# Altium PCB MainBoardPCB_PWR.PcbDoc (part 9 of 29)
Units mm, origin at the board's own origin, x right, y up, seen from the top; angles counter-clockwise.
Board outline 333.63 x 349.38 mm, 16 copper layers (L1, L2 (GND), L3 (Sign), L4 (GND), L5 (Sign), L6 (PWR/GND), L7(PWR/GND), L8 (PWR/GND), L9 (PWR/GND), L10 (PWR/GND), L11 (PWR/GND), L12 (Sign), L13 (GND), L14 (Sign), L15 (GND), L16), stack 2.503 mm thick; 2187 components, 1615 nets, 7987 pads, 1695 vias.
Unrouted connection lines stored in the file: 4757.
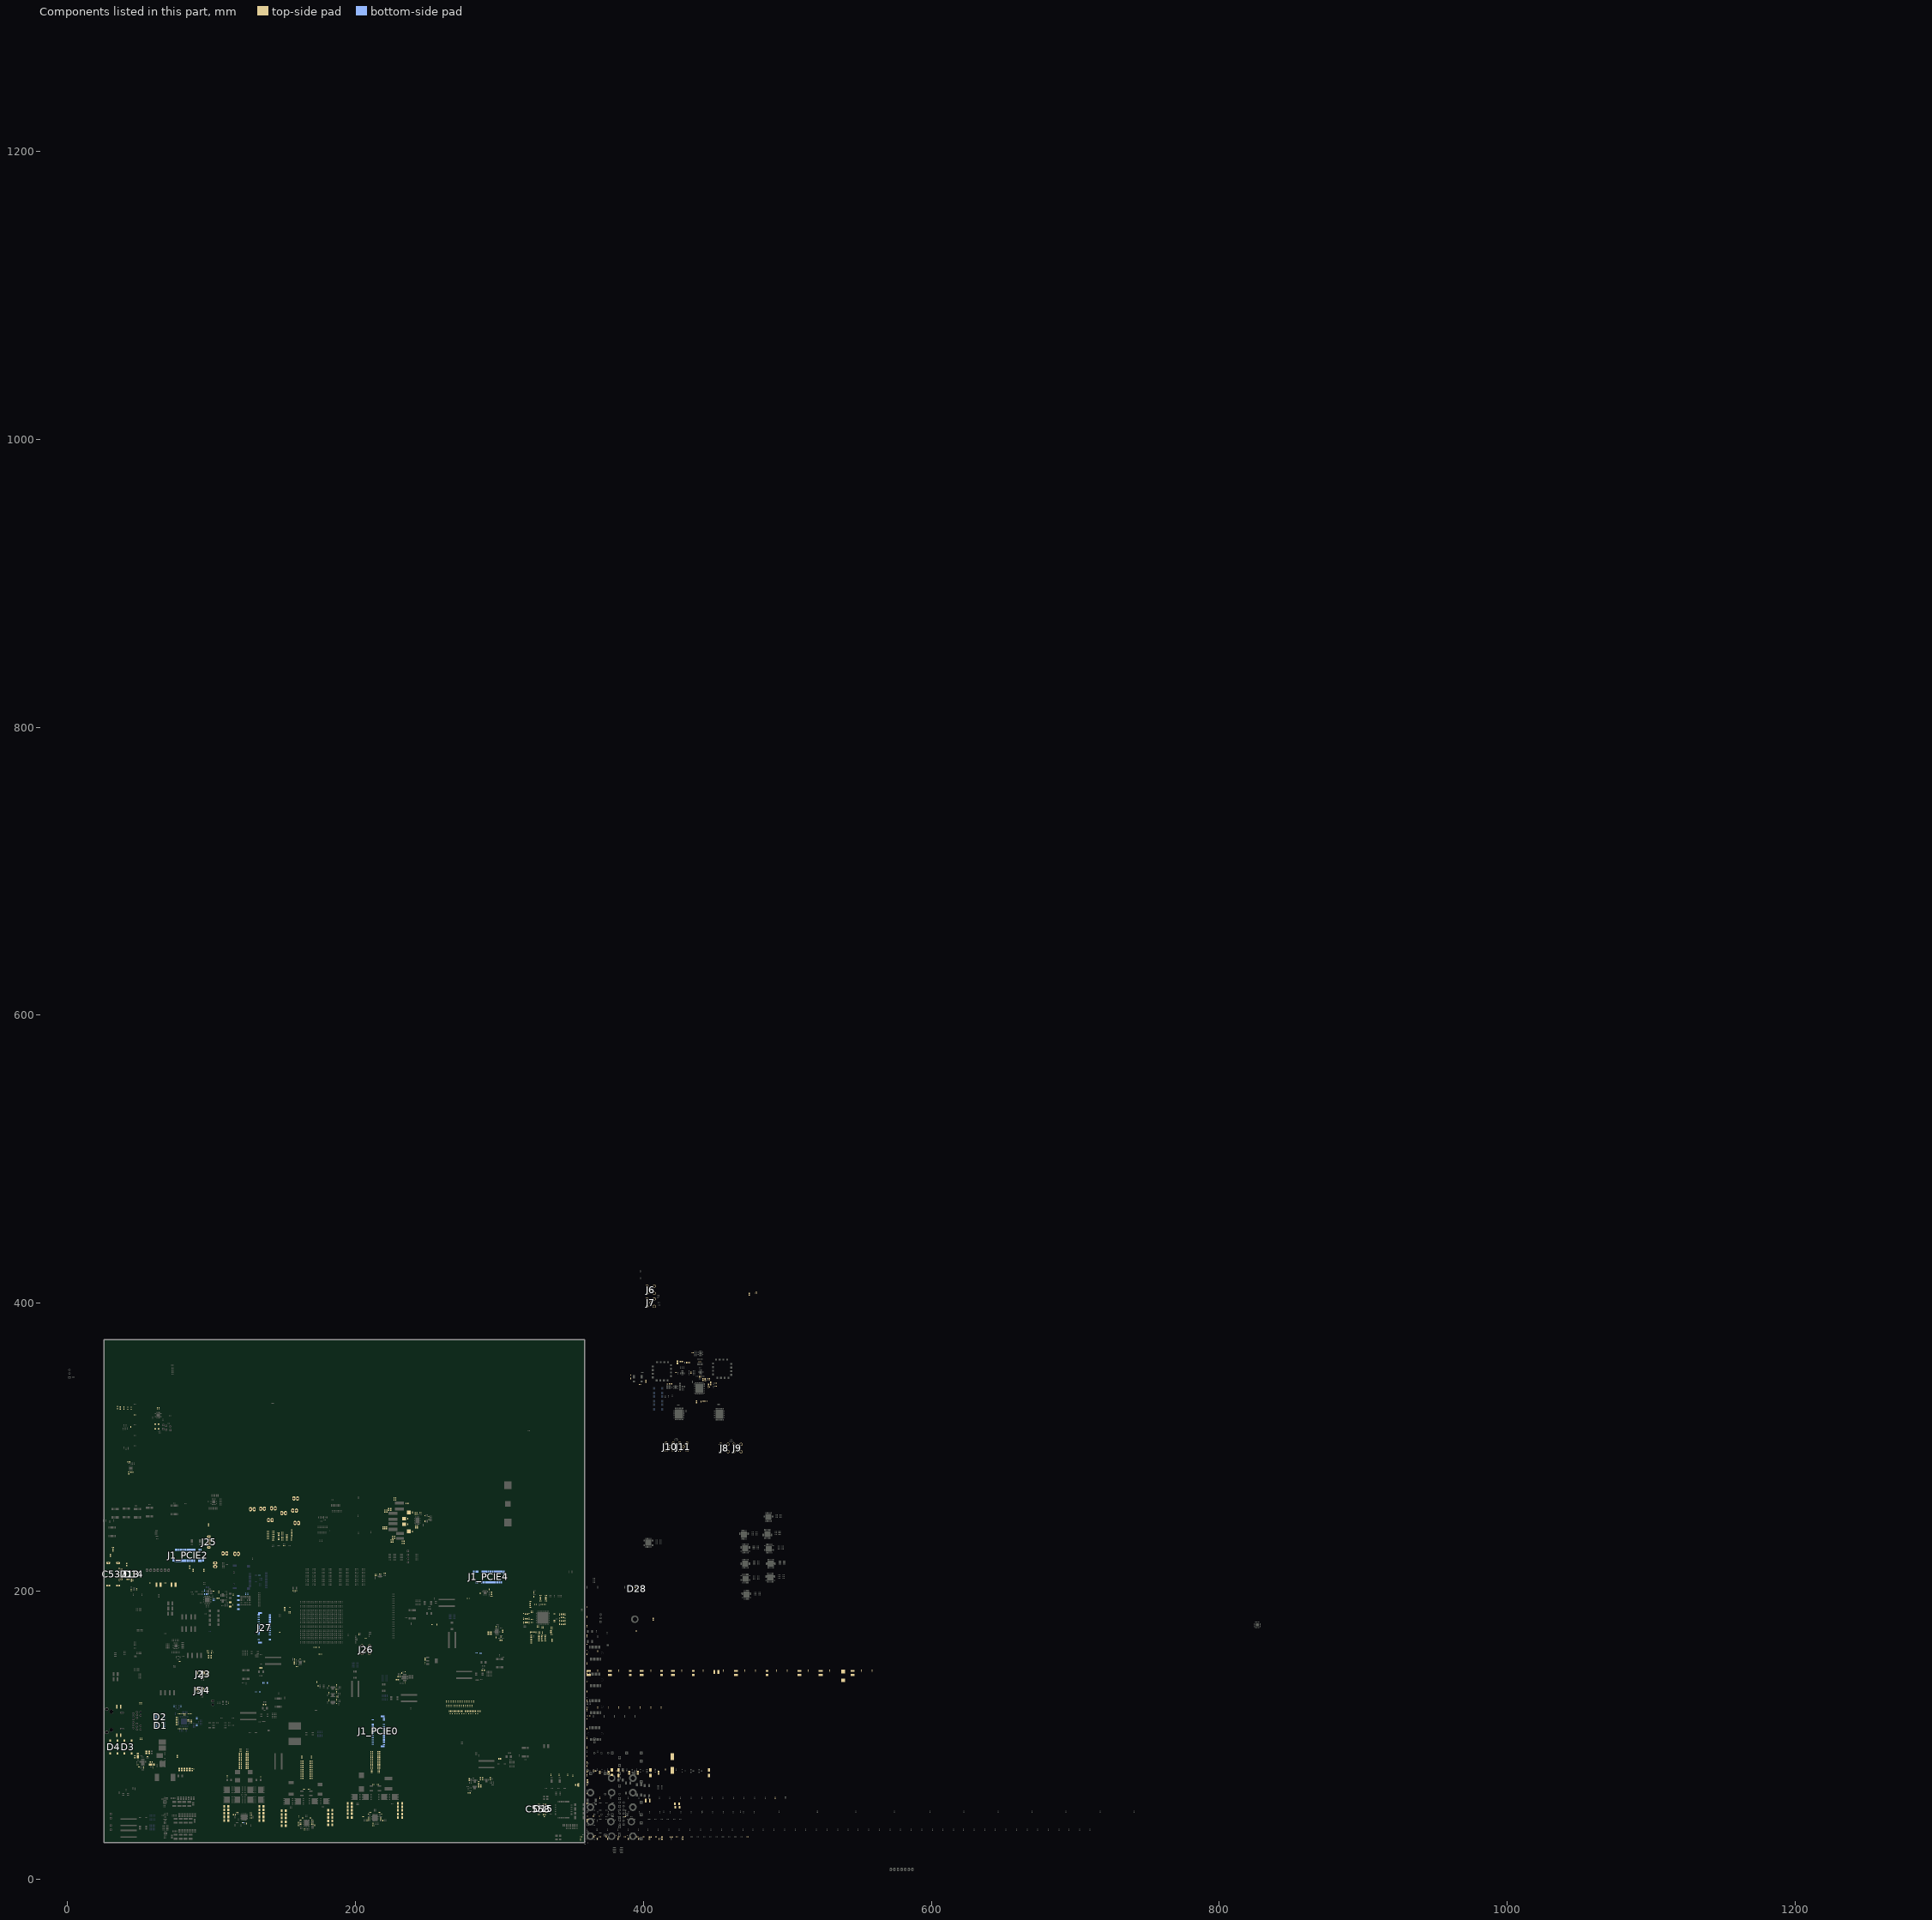
[diagram p14: the components of this part, seen from the top]

## Part data (continued)
C358: library part Capacitor, "Cap Ceramic 1uF 10V X5R 10% SMD 0603 85C Paper T/R", Case Code (Imperial)=0603, Case Code (Metric)=1608, Dielectric=X5R, Manufacturer=Samsung, Manufacturer Part Number=CL10A105KP8NNNC, Max Operating Temperature=85°C, Min Operating Temperature=-55°C, Package Quantity=1, Supplier Part Number 1=1276-1182-1-ND, Tolerance=10%, Voltage=10V, Capacitance=1uF, Case/Package=0603, Category="Ceramic Capacitors", ComponentLink1Description=https://datasheet.ciiva.com/15195/getdatasheetpartid-358616-15195708.pdf?src-supplier=Verical, ComponentLink1URL=https://datasheet.ciiva.com/15195/getdatasheetpartid-358616-15195708.pdf?src-supplier=Verical, ComponentLink2Description=https://datasheet.ciiva.com/16358/cl05b104kq5nnnc-16358431.pdf?src-supplier=Future+Electronics, ComponentLink2URL=https://datasheet.ciiva.com/16358/cl05b104kq5nnnc-16358431.pdf?src-supplier=Future+Electronics, Contact Plating=Tin, Depth=0.8mm, Height=0.8mm, Length=1.6mm, Mount="Surface Mount", Packaging="Tape and Reel", Pricing 1="1=0,10000, 10=0,03600, 100=0,01610, 500=0,01152, 1000=0,00905 (USD)", Radiation Hardening=No, RoHS=Yes, Stock 1=3646234, Supplier 1=Digi-Key, Thickness=0.035inch, Voltage Rating=10V, Width=0.031inch
C360 C378: library part Capacitor, Case Code (Imperial)=0402, Case Code (Metric)=1005, Dielectric=X5R, Manufacturer=Samsung, Manufacturer Part Number=CL05A474KP5NNNC, Max Operating Temperature=85°C, Min Operating Temperature=-55°C, Supplier Part Number 1=1276-1173-1-ND, Tolerance=10%, Voltage Rating=10V, Capacitance=470nF, Case/Package=0402, ComponentLink1Description=https://datasheet.ciiva.com/25710/cl05a474kp5nnnc-25710324.pdf?src-supplier=Digi-Key, ComponentLink1URL=https://datasheet.ciiva.com/25710/cl05a474kp5nnnc-25710324.pdf?src-supplier=Digi-Key, ComponentLink2Description=https://datasheet.ciiva.com/26838/getdatasheetpartid-355286-26838191.pdf?src-supplier=Verical, ComponentLink2URL=https://datasheet.ciiva.com/26838/getdatasheetpartid-355286-26838191.pdf?src-supplier=Verical, ComponentLink3Description=https://datasheet.ciiva.com/16437/cl05b104kq5nnnc-16437351.pdf?src-supplier=Future+Electronics, ComponentLink3URL=https://datasheet.ciiva.com/16437/cl05b104kq5nnnc-16437351.pdf?src-supplier=Future+Electronics, Depth=0.5mm, Height=0.5mm, Lead Free="Lead Free", Length=1mm, Mount="Surface Mount", Packaging="Tape and Reel", Pricing 1="1 = 0,10000, 10 = 0,07000, 100 = 0,03140, 500 = 0,02240, 1000 = 0,01761, 2500 = 0,01600, 5000 = 0,01472 (USD)", Radiation Hardening=No, RoHS=Yes, Stock 1=941442, Supplier 1=Digi-Key, Thickness=0.022inch, Voltage Rating (DC)=10V, Width=0.02inch
C362 C380 C539 C560 C563_5V_to_3V3_for_FTDI C563_U_5V_to_3V31 C563_U_5V_to_3V32 C563_U_5V_to_3V33 C564_5V_to_3V3_for_FTDI C564_U_5V_to_3V31 C564_U_5V_to_3V32 C564_U_5V_to_3V33 C565_5V_to_3V3_for_FTDI C565_U_5V_to_3V31 C565_U_5V_to_3V32 C565_U_5V_to_3V33 C659 C661: library part Capacitor, Case Code (Imperial)=0603, Case Code (Metric)=1608, Dielectric=X5R, Manufacturer=Samsung, Manufacturer Part Number=CL10A475KP8NNNC, Max Operating Temperature=85°C, Min Operating Temperature=-55°C, Package Quantity=1, Supplier Part Number 1=1276-1044-1-ND, Tolerance=10%, Voltage Rating=10V, Capacitance=4.7uF, Case/Package=0603, ComponentLink1Description=https://datasheet.ciiva.com/25797/cl10a475kp8nnnc-25797520.pdf?src-supplier=Digi-Key, ComponentLink1URL=https://datasheet.ciiva.com/25797/cl10a475kp8nnnc-25797520.pdf?src-supplier=Digi-Key, ComponentLink2Description=https://datasheet.ciiva.com/26838/getdatasheetpartid-358676-26838384.pdf?src-supplier=Verical, ComponentLink2URL=https://datasheet.ciiva.com/26838/getdatasheetpartid-358676-26838384.pdf?src-supplier=Verical, ComponentLink3Description=https://datasheet.ciiva.com/16318/cl05b104kq5nnnc-16318245.pdf?src-supplier=Future+Electronics, ComponentLink3URL=https://datasheet.ciiva.com/16318/cl05b104kq5nnnc-16318245.pdf?src-supplier=Future+Electronics, Contact Plating=Tin, Depth=0.8mm, Height=0.8mm, Length=1.6mm, Mount="Surface Mount", Packaging="Tape and Reel", Pricing 1="1 = 0,13000, 10 = 0,09600, 100 = 0,04520, 500 = 0,03168, 1000 = 0,02622 (USD)", Radiation Hardening=No, RoHS=Yes, Stock 1=2124648, Supplier 1=Digi-Key, Thickness=0.035inch, Width=0.031inch
C363 C365 C367 C369 C381 C383 C385 C387 C572 C576 C598 C631: library part Capacitor, Case Code (Imperial)=0603, Case Code (Metric)=1608, Dielectric=X5R, Manufacturer=Murata, Manufacturer Part Number=GRM188R61A106KE69D, Max Operating Temperature=85°C, Min Operating Temperature=-55°C, Supplier Part Number 1=490-10474-1-ND, Tolerance=10%, Voltage=10V, Capacitance=10uF, Case/Package=0603, ComponentLink1Description=http://components.arrow.com/part/dataview/0323_07281717?src-supplier=Arrow+Europe, ComponentLink1URL=http://components.arrow.com/part/dataview/0323_07281717?src-supplier=Arrow+Europe, ComponentLink2Description=http://www.farnell.com/datasheets/1955682.pdf?src-supplier=Farnell, ComponentLink2URL=http://www.farnell.com/datasheets/1955682.pdf?src-supplier=Farnell, ComponentLink3Description=http://www.mouser.com/ds/2/281/c02e-2905.pdf?src-supplier=Mouser, ComponentLink3URL=http://www.mouser.com/ds/2/281/c02e-2905.pdf?src-supplier=Mouser, ComponentLink4Description=http://search.murata.co.jp/Ceramy/image/img/A01X/G101/ENG/GRM188R61A106KE69-01.pdf?src-supplier=Digi-Key, ComponentLink4URL=http://search.murata.co.jp/Ceramy/image/img/A01X/G101/ENG/GRM188R61A106KE69-01.pdf?src-supplier=Digi-Key, ComponentLink5Description=http://www.farnell.com/datasheets/1955682.pdf?src-supplier=Element14, ComponentLink5URL=http://www.farnell.com/datasheets/1955682.pdf?src-supplier=Element14, ComponentLink6Description=http://www.farnell.com/datasheets/1955682.pdf?src-supplier=Newark, ComponentLink6URL=http://www.farnell.com/datasheets/1955682.pdf?src-supplier=Newark, ComponentLink7Description=http://psearch.en.murata.com/capacitor/product/GRM188R61A106KE69%23.pdf?src-supplier=Avnet, ComponentLink7URL=http://psearch.en.murata.com/capacitor/product/GRM188R61A106KE69%23.pdf?src-supplier=Avnet, Depth=0.8mm, Height=0.8mm, Lead Free="Lead Free", Length=1.6mm, Mount="Surface Mount", Packaging="Tape and Reel", Pricing 1="1 = 0,21000, 10 = 0,14000, 100 = 0,07110, 500 = 0,04864, 1000 = 0,04303 (USD)", REACH SVHC="No SVHC", RoHS=Yes, Stock 1=4597169, Supplier 1=Digi-Key, Thickness=0.037inch, Voltage Rating=10V, Voltage Rating (DC)=10V, Width=0.031inch
C364 C366 C368 C370 C382 C384 C386 C388: library part Capacitor, Case Code (Imperial)=0603, Case Code (Metric)=1608, Dielectric=X5R, Manufacturer=Murata, Manufacturer Part Number=GRM188R61A226ME15D, Max Operating Temperature=85°C, Min Operating Temperature=-55°C, Package Quantity=4000, Supplier Part Number 1=490-10476-1-ND, Tolerance=20%, Voltage Rating=10V, Capacitance=22uF, Case/Package=0603, ComponentLink1Description=https://datasheet.ciiva.com/46444/1769893-46444975.pdf?src-supplier=Element14, ComponentLink1URL=https://datasheet.ciiva.com/46444/1769893-46444975.pdf?src-supplier=Element14, Depth=0.8mm, Height=0.8mm, Lead Free="Lead Free", Length=1.6mm, Material=Ceramic, Mount="Surface Mount", Packaging="Tape and Reel", Pricing 1="1 = 0,31000, 10 = 0,21500, 100 = 0,12160, 500 = 0,08584, 1000 = 0,07512 (USD)", REACH SVHC="No SVHC", RoHS=Yes, Stock 1=1768748, Supplier 1=Digi-Key, Termination=SMD/SMT, Thickness=0.039inch, Voltage Rating (DC)=10V, Weight=0.000222oz, Width=0.8mm
C371 C372 C373 C374 C375 C376: library part Capacitor, "Cap Ceramic 10uF 25V X5R 10% SMD 1206 85C Embossed T/R", Case Code (Imperial)=1206, Case Code (Metric)=3216, Dielectric=X5R, Manufacturer=Samsung, Manufacturer Part Number=CL31A106KAHNNNE, Max Operating Temperature=85°C, Min Operating Temperature=-55°C, Supplier Part Number 1=1276-1075-1-ND, Tolerance=10%, Voltage=25V, Capacitance=10uF, Case/Package=1206, Category="Ceramic Capacitors", ComponentLink1Description=https://datasheet.ciiva.com/25710/cl31a106kahnnne-25710837.pdf?src-supplier=Digi-Key, ComponentLink1URL=https://datasheet.ciiva.com/25710/cl31a106kahnnne-25710837.pdf?src-supplier=Digi-Key, ComponentLink2Description=https://datasheet.ciiva.com/15195/getdatasheetpartid-355210-15195990.pdf?src-supplier=Verical, ComponentLink2URL=https://datasheet.ciiva.com/15195/getdatasheetpartid-355210-15195990.pdf?src-supplier=Verical, ComponentLink3Description=https://datasheet.ciiva.com/29201/452519-da-01-en-vs-kondensator-1206-29201124.pdf?src-supplier=Conrad, ComponentLink3URL=https://datasheet.ciiva.com/29201/452519-da-01-en-vs-kondensator-1206-29201124.pdf?src-supplier=Conrad, Contact Plating=Tin, Depth=1.6mm, Height=1.6mm, Lead Free="Lead Free", Length=3.2mm, Material=Ceramic, Mount="Surface Mount", Packaging="Tape and Reel", Pricing 1="1=0,22000, 10=0,15000, 100=0,07600, 500=0,05200, 1000=0,04600 (USD)", Radiation Hardening=No, RoHS=Yes, Stock 1=791813, Supplier 1=Digi-Key, Thickness=0.071inch, Voltage Rating=25V, Voltage Rating (DC)=25V, Width=0.063inch
C389 C393 C430 C434: library part Capacitor, Case/Package=0402, Case Code (Metric)=1005, Dielectric=C0G, Manufacturer="Kyocera AVX", Manufacturer Part Number=04025A220JAT2A, Max Operating Temperature=125°C, Min Operating Temperature=-55°C, Package Quantity=1, Supplier Part Number 1=478-1074-1-ND, Temperature Coefficient=30ppm/°C, Tolerance=5%, Voltage=50V, Capacitance=22pF, Case Code (Imperial)=0402, ComponentLink1Description=https://datasheet.ciiva.com/11787/0900766b80def0e2-11787300.pdf?src-supplier=RSComponents, ComponentLink1URL=https://datasheet.ciiva.com/11787/0900766b80def0e2-11787300.pdf?src-supplier=RSComponents, ComponentLink2Description=https://datasheet.ciiva.com/39121/2009578-39121644.pdf?src-supplier=Jameco, ComponentLink2URL=https://datasheet.ciiva.com/39121/2009578-39121644.pdf?src-supplier=Jameco, ComponentLink3Description=https://datasheet.ciiva.com/1123/ccog-1123585.pdf?src-supplier=Element14, ComponentLink3URL=https://datasheet.ciiva.com/1123/ccog-1123585.pdf?src-supplier=Element14, ComponentLink4Description=https://datasheet.ciiva.com/1123/ccog-1123586.pdf?src-supplier=Element14, ComponentLink4URL=https://datasheet.ciiva.com/1123/ccog-1123586.pdf?src-supplier=Element14, ComponentLink5Description=https://datasheet.ciiva.com/150/ccog-150515.pdf?src-supplier=Digi-Key, ComponentLink5URL=https://datasheet.ciiva.com/150/ccog-150515.pdf?src-supplier=Digi-Key, ComponentLink6Description=https://datasheet.ciiva.com/150/ccog-150516.pdf?src-supplier=Digi-Key, ComponentLink6URL=https://datasheet.ciiva.com/150/ccog-150516.pdf?src-supplier=Digi-Key, ComponentLink7Description=https://datasheet.ciiva.com/150/ccog-150517.pdf?src-supplier=Digi-Key, ComponentLink7URL=https://datasheet.ciiva.com/150/ccog-150517.pdf?src-supplier=Digi-Key, ComponentLink8Description=https://datasheet.ciiva.com/2987/ccog-2987653.pdf?src-supplier=Avnet, ComponentLink8URL=https://datasheet.ciiva.com/2987/ccog-2987653.pdf?src-supplier=Avnet, ComponentLink9Description=https://datasheet.ciiva.com/2987/ccog-2987654.pdf?src-supplier=Avnet, ComponentLink9URL=https://datasheet.ciiva.com/2987/ccog-2987654.pdf?src-supplier=Avnet, ComponentLink10Description=https://datasheet.ciiva.com/5423/ccog-243403-5423927.pdf?src-supplier=Mouser, ComponentLink10URL=https://datasheet.ciiva.com/5423/ccog-243403-5423927.pdf?src-supplier=Mouser, ComponentLink11Description=https://datasheet.ciiva.com/16218/ccog-16218185.pdf?src-supplier=Future+Electronics, ComponentLink11URL=https://datasheet.ciiva.com/16218/ccog-16218185.pdf?src-supplier=Future+Electronics, ComponentLink12Description=https://datasheet.ciiva.com/28592/759117-28592746.pdf?src-supplier=Element14, ComponentLink12URL=https://datasheet.ciiva.com/28592/759117-28592746.pdf?src-supplier=Element14, ComponentLink13Description=https://datasheet.ciiva.com/15165/getdatasheetpartid-38041-15165131.pdf?src-supplier=Verical, ComponentLink13URL=https://datasheet.ciiva.com/15165/getdatasheetpartid-38041-15165131.pdf?src-supplier=Verical, Contact Plating=Tin,Matte, Depth=0.5mm, Height=0.5mm, Lead Free="Lead Free", Length=1mm, Mount="Surface Mount", Number of Pins=2, Packaging="Tape and Reel", Pricing 1="1 = 0,10000, 10 = 0,03500, 100 = 0,01550, 500 = 0,01108, 1000 = 0,00871, 2500 = 0,00792, 5000 = 0,00729 (USD)", Radiation Hardening=No, REACH SVHC="No SVHC", RoHS=Yes, Stock 1=1489814, Supplier 1=Digi-Key, Termination=SMD/SMT, Thickness=0.022inch, Voltage Rating=50V, Voltage Rating (DC)=50V, Width=0.02inch
C390 C394 C431 C435: library part Capacitor, Case/Package=0402, Case Code (Metric)=1005, Dielectric=X5R, Manufacturer=Multicomp, Manufacturer Part Number=MC0402X104K160CT, Max Operating Temperature=85°C, Min Operating Temperature=-55°C, Supplier Part Number 1=2310529, Tolerance=10%, Voltage Rating=16V, Capacitance=100nF, Case Code (Imperial)=0402, ComponentLink1Description=https://datasheet.ciiva.com/22648/1901289-22648380.pdf?src-supplier=Element14, ComponentLink1URL=https://datasheet.ciiva.com/22648/1901289-22648380.pdf?src-supplier=Element14, ComponentLink2Description=https://datasheet.ciiva.com/22648/1901289-22648381.pdf?src-supplier=Element14, ComponentLink2URL=https://datasheet.ciiva.com/22648/1901289-22648381.pdf?src-supplier=Element14, ComponentLink3Description=https://datasheet.ciiva.com/22686/1901289-22686271.pdf?src-supplier=Element14, ComponentLink3URL=https://datasheet.ciiva.com/22686/1901289-22686271.pdf?src-supplier=Element14, Number of Pins=2, Packaging="Cut Tape", REACH SVHC=Unknown, RoHS=Yes, Stock 1=510000, Supplier 1=Farnell, Voltage Rating (DC)=16V
C395 C398 C408 C420 C436 C439 C449 C461 C522: library part Capacitor, Case/Package=0402, Case Code (Metric)=1005, Dielectric=X5R, Manufacturer=Yageo, Manufacturer Part Number=CC0402KRX5R6BB105, Max Operating Temperature=85°C, Min Operating Temperature=-55°C, Package Quantity=1, Supplier Part Number 1=311-1439-1-ND, Tolerance=10%, Voltage Rating=10V, Capacitance=1uF, Case Code (Imperial)=0402, ComponentLink1Description=https://datasheet.ciiva.com/176/upy-gphc-x5r-4v-to-50v-12-176704.pdf?src-supplier=Digi-Key, ComponentLink1URL=https://datasheet.ciiva.com/176/upy-gphc-x5r-4v-to-50v-12-176704.pdf?src-supplier=Digi-Key, ComponentLink2Description=https://datasheet.ciiva.com/176/mlccorderingcode-176705.pdf?src-supplier=Digi-Key, ComponentLink2URL=https://datasheet.ciiva.com/176/mlccorderingcode-176705.pdf?src-supplier=Digi-Key, ComponentLink3Description=https://datasheet.ciiva.com/176/mlccorderingcode-176706.pdf?src-supplier=Digi-Key, ComponentLink3URL=https://datasheet.ciiva.com/176/mlccorderingcode-176706.pdf?src-supplier=Digi-Key, Composition=Ceramic, Depth=0.5mm, Dissipation Factor=15%, Halogen Free="Halogen Free", Height=0.5mm, Lead Free="Lead Free", Length=1mm, Mount="Surface Mount", Number of Pins=2, Packaging="Tape and Reel", Pricing 1="1 = 0,10000, 10 = 0,06300, 100 = 0,02790, 500 = 0,01996, 1000 = 0,01568, 2500 = 0,01425, 5000 = 0,01311 (USD)", Radiation Hardening=No, REACH SVHC="No SVHC", RoHS=Yes, Stock 1=6046339, Supplier 1=Digi-Key, Termination=SMD/SMT, Thickness=0.022inch, Voltage Rating (DC)=10V, Width=0.02inch
C400 C401 C402 C403 C404 C405 C441 C442 C443 C444 C445 C446: library part Capacitor, "Cap Ceramic 10uF 25V X5R 10% SMD 1206 85C Embossed T/R", Case/Package=1206, Case Code (Metric)=3216, Dielectric=X5R, Manufacturer=Samsung, Manufacturer Part Number=CL31A106KAHNNNE, Max Operating Temperature=85°C, Min Operating Temperature=-55°C, Supplier Part Number 1=1276-1075-1-ND, Tolerance=10%, Voltage=25V, Capacitance=10uF, Case Code (Imperial)=1206, Category="Ceramic Capacitors", ComponentLink1Description=https://datasheet.ciiva.com/25710/cl31a106kahnnne-25710837.pdf?src-supplier=Digi-Key, ComponentLink1URL=https://datasheet.ciiva.com/25710/cl31a106kahnnne-25710837.pdf?src-supplier=Digi-Key, ComponentLink2Description=https://datasheet.ciiva.com/15195/getdatasheetpartid-355210-15195990.pdf?src-supplier=Verical, ComponentLink2URL=https://datasheet.ciiva.com/15195/getdatasheetpartid-355210-15195990.pdf?src-supplier=Verical, ComponentLink3Description=https://datasheet.ciiva.com/29201/452519-da-01-en-vs-kondensator-1206-29201124.pdf?src-supplier=Conrad, ComponentLink3URL=https://datasheet.ciiva.com/29201/452519-da-01-en-vs-kondensator-1206-29201124.pdf?src-supplier=Conrad, Contact Plating=Tin, Depth=1.6mm, Height=1.6mm, Lead Free="Lead Free", Length=3.2mm, Material=Ceramic, Mount="Surface Mount", Packaging="Tape and Reel", Pricing 1="1=0,22000, 10=0,15000, 100=0,07600, 500=0,05200, 1000=0,04600 (USD)", Radiation Hardening=No, RoHS=Yes, Stock 1=791813, Supplier 1=Digi-Key, Thickness=0.071inch, Voltage Rating=25V, Voltage Rating (DC)=25V, Width=0.063inch
C407 C419 C448 C460: library part Capacitor, Case/Package=0402, Case Code (Metric)=1005, Dielectric=X5R, Manufacturer=Samsung, Manufacturer Part Number=CL05A474KP5NNNC, Max Operating Temperature=85°C, Min Operating Temperature=-55°C, Supplier Part Number 1=1276-1173-1-ND, Tolerance=10%, Voltage Rating=10V, Capacitance=470nF, Case Code (Imperial)=0402, ComponentLink1Description=https://datasheet.ciiva.com/25710/cl05a474kp5nnnc-25710324.pdf?src-supplier=Digi-Key, ComponentLink1URL=https://datasheet.ciiva.com/25710/cl05a474kp5nnnc-25710324.pdf?src-supplier=Digi-Key, ComponentLink2Description=https://datasheet.ciiva.com/26838/getdatasheetpartid-355286-26838191.pdf?src-supplier=Verical, ComponentLink2URL=https://datasheet.ciiva.com/26838/getdatasheetpartid-355286-26838191.pdf?src-supplier=Verical, ComponentLink3Description=https://datasheet.ciiva.com/16437/cl05b104kq5nnnc-16437351.pdf?src-supplier=Future+Electronics, ComponentLink3URL=https://datasheet.ciiva.com/16437/cl05b104kq5nnnc-16437351.pdf?src-supplier=Future+Electronics, Depth=0.5mm, Height=0.5mm, Lead Free="Lead Free", Length=1mm, Mount="Surface Mount", Packaging="Tape and Reel", Pricing 1="1 = 0,10000, 10 = 0,07000, 100 = 0,03140, 500 = 0,02240, 1000 = 0,01761, 2500 = 0,01600, 5000 = 0,01472 (USD)", Radiation Hardening=No, RoHS=Yes, Stock 1=941442, Supplier 1=Digi-Key, Thickness=0.022inch, Voltage Rating (DC)=10V, Width=0.02inch
C409 C421 C450 C462 C515 C516 C523 C524: library part Capacitor, Case/Package=0603, Case Code (Metric)=1608, Dielectric=X5R, Manufacturer=Samsung, Manufacturer Part Number=CL10A475KP8NNNC, Max Operating Temperature=85°C, Min Operating Temperature=-55°C, Package Quantity=1, Supplier Part Number 1=1276-1044-1-ND, Tolerance=10%, Voltage Rating=10V, Capacitance=4.7uF, Case Code (Imperial)=0603, ComponentLink1Description=https://datasheet.ciiva.com/25797/cl10a475kp8nnnc-25797520.pdf?src-supplier=Digi-Key, ComponentLink1URL=https://datasheet.ciiva.com/25797/cl10a475kp8nnnc-25797520.pdf?src-supplier=Digi-Key, ComponentLink2Description=https://datasheet.ciiva.com/26838/getdatasheetpartid-358676-26838384.pdf?src-supplier=Verical, ComponentLink2URL=https://datasheet.ciiva.com/26838/getdatasheetpartid-358676-26838384.pdf?src-supplier=Verical, ComponentLink3Description=https://datasheet.ciiva.com/16318/cl05b104kq5nnnc-16318245.pdf?src-supplier=Future+Electronics, ComponentLink3URL=https://datasheet.ciiva.com/16318/cl05b104kq5nnnc-16318245.pdf?src-supplier=Future+Electronics, Contact Plating=Tin, Depth=0.8mm, Height=0.8mm, Length=1.6mm, Mount="Surface Mount", Packaging="Tape and Reel", Pricing 1="1 = 0,13000, 10 = 0,09600, 100 = 0,04520, 500 = 0,03168, 1000 = 0,02622 (USD)", Radiation Hardening=No, RoHS=Yes, Stock 1=2124648, Supplier 1=Digi-Key, Thickness=0.035inch, Width=0.031inch
C410 C412 C414 C416 C422 C424 C426 C428 C451 C453 C455 C457 C463 C465 C467 C469 C705 C709: library part Capacitor, Case/Package=0603, Case Code (Metric)=1608, Dielectric=X5R, Manufacturer=Murata, Manufacturer Part Number=GRM188R61A106KE69D, Max Operating Temperature=85°C, Min Operating Temperature=-55°C, Supplier Part Number 1=490-10474-1-ND, Tolerance=10%, Voltage=10V, Capacitance=10uF, Case Code (Imperial)=0603, ComponentLink1Description=http://components.arrow.com/part/dataview/0323_07281717?src-supplier=Arrow+Europe, ComponentLink1URL=http://components.arrow.com/part/dataview/0323_07281717?src-supplier=Arrow+Europe, ComponentLink2Description=http://www.farnell.com/datasheets/1955682.pdf?src-supplier=Farnell, ComponentLink2URL=http://www.farnell.com/datasheets/1955682.pdf?src-supplier=Farnell, ComponentLink3Description=http://www.mouser.com/ds/2/281/c02e-2905.pdf?src-supplier=Mouser, ComponentLink3URL=http://www.mouser.com/ds/2/281/c02e-2905.pdf?src-supplier=Mouser, ComponentLink4Description=http://search.murata.co.jp/Ceramy/image/img/A01X/G101/ENG/GRM188R61A106KE69-01.pdf?src-supplier=Digi-Key, ComponentLink4URL=http://search.murata.co.jp/Ceramy/image/img/A01X/G101/ENG/GRM188R61A106KE69-01.pdf?src-supplier=Digi-Key, ComponentLink5Description=http://www.farnell.com/datasheets/1955682.pdf?src-supplier=Element14, ComponentLink5URL=http://www.farnell.com/datasheets/1955682.pdf?src-supplier=Element14, ComponentLink6Description=http://www.farnell.com/datasheets/1955682.pdf?src-supplier=Newark, ComponentLink6URL=http://www.farnell.com/datasheets/1955682.pdf?src-supplier=Newark, ComponentLink7Description=http://psearch.en.murata.com/capacitor/product/GRM188R61A106KE69%23.pdf?src-supplier=Avnet, ComponentLink7URL=http://psearch.en.murata.com/capacitor/product/GRM188R61A106KE69%23.pdf?src-supplier=Avnet, Depth=0.8mm, Height=0.8mm, Lead Free="Lead Free", Length=1.6mm, Mount="Surface Mount", Packaging="Tape and Reel", Pricing 1="1 = 0,21000, 10 = 0,14000, 100 = 0,07110, 500 = 0,04864, 1000 = 0,04303 (USD)", REACH SVHC="No SVHC", RoHS=Yes, Stock 1=4597169, Supplier 1=Digi-Key, Thickness=0.037inch, Voltage Rating=10V, Voltage Rating (DC)=10V, Width=0.031inch
C411 C413 C415 C417 C423 C425 C427 C429 C452 C454 C456 C458 C464 C466 C468 C470: library part Capacitor, Case/Package=0603, Case Code (Metric)=1608, Dielectric=X5R, Manufacturer=Murata, Manufacturer Part Number=GRM188R61A226ME15D, Max Operating Temperature=85°C, Min Operating Temperature=-55°C, Package Quantity=4000, Supplier Part Number 1=490-10476-1-ND, Tolerance=20%, Voltage Rating=10V, Capacitance=22uF, Case Code (Imperial)=0603, ComponentLink1Description=https://datasheet.ciiva.com/46444/1769893-46444975.pdf?src-supplier=Element14, ComponentLink1URL=https://datasheet.ciiva.com/46444/1769893-46444975.pdf?src-supplier=Element14, Depth=0.8mm, Height=0.8mm, Lead Free="Lead Free", Length=1.6mm, Material=Ceramic, Mount="Surface Mount", Packaging="Tape and Reel", Pricing 1="1 = 0,31000, 10 = 0,21500, 100 = 0,12160, 500 = 0,08584, 1000 = 0,07512 (USD)", REACH SVHC="No SVHC", RoHS=Yes, Stock 1=1768748, Supplier 1=Digi-Key, Termination=SMD/SMT, Thickness=0.039inch, Voltage Rating (DC)=10V, Weight=0.000222oz, Width=0.8mm
C471 C472 C473 C474: library part Capacitor, Case/Package=0402, Case Code (Metric)=1005, Dielectric=X5R, Manufacturer 1=Yageo, Manufacturer Part Number 1=CC0402KRX5R8BB104, Max Operating Temperature=85°C, Min Operating Temperature=-55°C, Supplier Part Number 1=311-1697-1-ND, Tolerance=10%, Voltage Rating=25V, Capacitance=100nF, Case Code (Imperial)=0402, ComponentLink1Description=http://components.arrow.com/part/dataview/0323_04166396?src-supplier=Arrow+Europe, ComponentLink1URL=http://components.arrow.com/part/dataview/0323_04166396?src-supplier=Arrow+Europe, ComponentLink2Description=http://www.mouser.com/ds/2/447/UPY-GPHC_X5R_4V-to-50V_25-1131599.pdf?src-supplier=Mouser, ComponentLink2URL=http://www.mouser.com/ds/2/447/UPY-GPHC_X5R_4V-to-50V_25-1131599.pdf?src-supplier=Mouser, ComponentLink3Description=http://www.yageo.com/documents/recent/UPY-GPHC_X5R_4V-to-50V-16.pdf?src-supplier=Future+Electronics, ComponentLink3URL=http://www.yageo.com/documents/recent/UPY-GPHC_X5R_4V-to-50V-16.pdf?src-supplier=Future+Electronics, ComponentLink4Description=http://www.yageo.com/documents/recent/UPY-GPHC_X5R_4V-to-50V_25.pdf?src-supplier=Digi-Key, ComponentLink4URL=http://www.yageo.com/documents/recent/UPY-GPHC_X5R_4V-to-50V_25.pdf?src-supplier=Digi-Key, Composition=Ceramic, Depth=0.5mm, Halogen Free="Halogen Free", Lead Free="Lead Free", Length=0.039inch, Mount="Surface Mount", Packaging="Tape and Reel", Pricing 1="1=0,10000, 10=0,04400, 100=0,01960, 500=0,01404, 1000=0,01103, 2500=0,01002, 5000=0,00922 (USD)", RoHS=Yes, Stock 1=985404, Supplier 1=Digi-Key, Thickness=0.022inch, Voltage Rating (DC)=25V, Width=0.02inch
C475 C476 C672: "CAP CER 1210 4.7NF 2000V X7R 10%", Capacitance==Capacitance, Case Code (Imperial)=1210, Case Code (Metric)=3225, Manufacturer=KEMET, Manufacturer Part Number=C1210X472KGRACAUTO, Max Operating Temperature=125°C, Min Operating Temperature=-55°C, Ratings=AEC-Q200, Supplier Part Number 1=399-16765-1-ND, Tolerance=10%, Voltage Rating=2kV, Case/Package=1210, ComponentLink1Description=https://api.kemet.com/component-edge/download/datasheet/C1210X472KGRACAUTO.pdf?src-supplier=Digi-Key, ComponentLink1URL=https://api.kemet.com/component-edge/download/datasheet/C1210X472KGRACAUTO.pdf?src-supplier=Digi-Key, ComponentLink2Description=https://api.kemet.com/component-edge/download/specsheet/C1210X472KGRACAUTO.pdf?src-supplier=Digi-Key, ComponentLink2URL=https://api.kemet.com/component-edge/download/specsheet/C1210X472KGRACAUTO.pdf?src-supplier=Digi-Key, Features="Soft Termination", Mount="Surface Mount", Packaging="Tape and Reel", Pricing 1="1=1,86000, 10=1,46700, 100=1,10030, 500=0,83136, 1000=0,73356 (USD)", RoHS=No, Stock 1=3811, Supplier 1=Digi-Key
C480 C481: library part Capacitor, "Multilayer Ceramic Capacitors MLCC - SMD/SMT 16V 27pF C0G 0402 10% Tol", Case Code (Imperial)=0402, Case Code (Metric)=1005, Dielectric=C0G, Manufacturer="Kyocera AVX", Manufacturer Part Number=0402YA270KAT2A, Max Operating Temperature=125°C, Min Operating Temperature=-55°C, Package Quantity=10000, Supplier Part Number 1=66M2135, Tolerance=10%, Voltage Rating=16V, Capacitance=27pF, Case/Package=0402, Category="Ceramic Capacitors", ComponentLink1Description=https://datasheet.ciiva.com/6269/ccog-6269725.pdf?src-supplier=Digi-Key, ComponentLink1URL=https://datasheet.ciiva.com/6269/ccog-6269725.pdf?src-supplier=Digi-Key, ComponentLink2Description=https://datasheet.ciiva.com/15380/ccog-15380792.pdf?src-supplier=Mouser, ComponentLink2URL=https://datasheet.ciiva.com/15380/ccog-15380792.pdf?src-supplier=Mouser, Depth=0.5mm, Length=1mm, Mount="Surface Mount", Number of Pins=2, Packaging="Tape and Reel", Radiation Hardening=No, RoHS=Yes, Supplier 1=Newark, Termination=SMD/SMT, Thickness=0.022inch, Voltage Rating (DC)=16V, Width=0.5mm
C485 C486 C491 C492 C493 C499 C500 C505 C506 C507 C508: library part Capacitor, Case/Package=0402, Dielectric=X5R, Dielectric Material=Ceramic, Manufacturer 1=KEMET, Manufacturer Part Number 1=C0402C105K9PACTU, Max Operating Temperature=85°C, Min Operating Temperature=-55°C, Package Quantity=1, Supplier Part Number 1=399-4873-6-ND, Tolerance=10%, Voltage=6.3V, Capacitance=1uF, Case Code (Imperial)=0402, ComponentLink1Description=https://datasheet.ciiva.com/28645/1789732-28645392.pdf?src-supplier=Element14, ComponentLink1URL=https://datasheet.ciiva.com/28645/1789732-28645392.pdf?src-supplier=Element14, ComponentLink2Description=https://datasheet.ciiva.com/11786/0900766b8116eb59-11786028.pdf?src-supplier=RSComponents, ComponentLink2URL=https://datasheet.ciiva.com/11786/0900766b8116eb59-11786028.pdf?src-supplier=RSComponents, ComponentLink3Description=https://datasheet.ciiva.com/7747/kem-c1006-x5r-smd-7747445.pdf?src-supplier=Element14, ComponentLink3URL=https://datasheet.ciiva.com/7747/kem-c1006-x5r-smd-7747445.pdf?src-supplier=Element14, ComponentLink4Description=https://datasheet.ciiva.com/7747/40889-7747623.pdf?src-supplier=Element14, ComponentLink4URL=https://datasheet.ciiva.com/7747/40889-7747623.pdf?src-supplier=Element14, ComponentLink5Description=https://datasheet.ciiva.com/18192/getdatasheetpartid-127800-18192427.pdf?src-supplier=Verical, ComponentLink5URL=https://datasheet.ciiva.com/18192/getdatasheetpartid-127800-18192427.pdf?src-supplier=Verical, Depth=0.5mm, Height=0.5mm, Lead Free="Lead Free", Lead Pitch=0.3mm, Length=1mm, Mount="Surface Mount", Number of Pins=2, Packaging="Tape and Reel", Pricing 1="1=0,10000, 10=0,02600, 100=0,01180, 500=0,00844, 1000=0,00662, 2500=0,00602, 5000=0,00554 (USD)", Radiation Hardening=No, REACH SVHC="No SVHC", RoHS=Yes, Stock 1=1718266, Supplier 1=Digi-Key, Termination=SMD/SMT, Thickness=0.022inch, Voltage Rating=6.3V, Voltage Rating (DC)=6.3V, Width=0.02inch
C487 C488 C494 C495 C496 C501 C502 C509 C510 C511 C512 C561 C562: library part Capacitor, Case/Package=0402, Case Code (Metric)=1005, Dielectric=X5R, Dielectric Material=Ceramic, Manufacturer 1=KEMET, Manufacturer Part Number 1=C0402C104M9PACTU, Max Operating Temperature=85°C, Min Operating Temperature=-55°C, Package Quantity=1, Supplier Part Number 1=399-8944-1-ND, Tolerance=20%, Voltage Rating=6.3V, Capacitance=100nF, Case Code (Imperial)=0402, ComponentLink1Description=https://datasheet.ciiva.com/5413/kem-c1006-x5r-smd-5413575.pdf?src-supplier=Mouser, ComponentLink1URL=https://datasheet.ciiva.com/5413/kem-c1006-x5r-smd-5413575.pdf?src-supplier=Mouser, Depth=0.5mm, Height=0.5mm, Lead Free="Lead Free", Length=1mm, Mount="Surface Mount", Packaging="Tape and Reel", Pricing 1="1=0,10000, 10=0,02800, 100=0,01240, 500=0,00886, 1000=0,00696, 2500=0,00632, 5000=0,00582 (USD)", Radiation Hardening=No, RoHS=Yes, Stock 1=83777, Supplier 1=Digi-Key, Termination=SMD/SMT, Thickness=0.022inch, Voltage Rating (DC)=6.3V, Width=0.02inch
C489 C497 C503 C513: library part Capacitor, Case/Package=0402, Case Code (Metric)=1005, Manufacturer 1=Murata, Manufacturer Part Number 1=GRJ155R60J106ME11D, Max Operating Temperature=85°C, Min Operating Temperature=-55°C, Supplier Part Number 1=490-13211-1-ND, Tolerance=20%, Voltage Rating=6.3V, Capacitance=10uF, Case Code (Imperial)=0402, ComponentLink1Description=http://psearch.en.murata.com/capacitor/product/GRJ155R60J106ME11%23.pdf?src-supplier=Digi-Key, ComponentLink1URL=http://psearch.en.murata.com/capacitor/product/GRJ155R60J106ME11%23.pdf?src-supplier=Digi-Key, Features="Soft Termination", Length=0.039inch, Mount="Surface Mount", Packaging="Cut Tape", Pricing 1="1=0,22000, 10=0,15100, 100=0,07660, 500=0,05242, 1000=0,04637, 2500=0,04435, 5000=0,04032 (USD)", RoHS=Yes, Stock 1=250946, Supplier 1=Digi-Key, Thickness=0.028inch, Width=0.02inch
C490 C498 C504 C514: library part Capacitor, Case/Package=0402, Case Code (Metric)=1005, Dielectric=X5R, Dielectric Material=Ceramic, Manufacturer 1=KEMET, Manufacturer Part Number 1=C0402C103K4PACTU, Max Operating Temperature=85°C, Min Operating Temperature=-55°C, Supplier Part Number 1=399-11930-1-ND, Tolerance=10%, Voltage Rating=16V, Capacitance=10nF, Case Code (Imperial)=0402, ComponentLink1Description=http://www.farnell.com/datasheets/2314920.pdf?src-supplier=Farnell, ComponentLink1URL=http://www.farnell.com/datasheets/2314920.pdf?src-supplier=Farnell, ComponentLink2Description=http://www.kemet.com/Lists/ProductCatalog/Attachments/19/KEM_C1006_X5R_SMD.pdf?src-supplier=Avnet, ComponentLink2URL=http://www.kemet.com/Lists/ProductCatalog/Attachments/19/KEM_C1006_X5R_SMD.pdf?src-supplier=Avnet, ComponentLink3Description=https://api.kemet.com/component-edge/download/datasheet/C0402C103K4PAC7867.pdf?src-supplier=Digi-Key, ComponentLink3URL=https://api.kemet.com/component-edge/download/datasheet/C0402C103K4PAC7867.pdf?src-supplier=Digi-Key, ComponentLink4Description=http://www.kemet.com/docfinder?Partnumber=C0402C103K4PAC7867&src-supplier=Digi-Key, ComponentLink4URL=http://www.kemet.com/docfinder?Partnumber=C0402C103K4PAC7867&src-supplier=Digi-Key, ComponentLink5Description=http://www.farnell.com/datasheets/2314920.pdf?src-supplier=Newark, ComponentLink5URL=http://www.farnell.com/datasheets/2314920.pdf?src-supplier=Newark, Lead Free="Lead Free", Length=0.039inch, Mount="Surface Mount", Packaging="Cut Tape", Pricing 1="1=0,10000, 10=0,05600, 100=0,02480, 500=0,01772, 1000=0,01392, 2500=0,01265, 5000=0,01164 (USD)", RoHS=Yes, Stock 1=41933, Supplier 1=Digi-Key, Thickness=0.022inch, Voltage Rating (DC)=16V, Width=0.02inch
C518 C520 C587: library part Capacitor, "CAP CER 2.2UF 6.3V X5R 0402", Case/Package=0402, Case Code (Metric)=1005, Dielectric=X5R, Manufacturer="Taiyo Yuden", Manufacturer Part Number=JMK105BJ225KV-F, Max Operating Temperature=85°C, Min Operating Temperature=-55°C, Package Quantity=10000, Supplier Part Number 1=587-5867-1-ND, Tolerance=10%, Voltage Rating=6.3V, Capacitance=2.2uF, Case Code (Imperial)=0402, Category="Ceramic Capacitors", ComponentLink1Description=https://datasheet.ciiva.com/15921/tmk105b7103kv-15921011.pdf?src-supplier=Onlinecomponents.com, ComponentLink1URL=https://datasheet.ciiva.com/15921/tmk105b7103kv-15921011.pdf?src-supplier=Onlinecomponents.com, ComponentLink2Description=https://datasheet.ciiva.com/30178/cmultilayerceramiccapacitor-30178599.pdf?src-supplier=Onlinecomponents.com, ComponentLink2URL=https://datasheet.ciiva.com/30178/cmultilayerceramiccapacitor-30178599.pdf?src-supplier=Onlinecomponents.com, Composition=Ceramic, Depth=0.5mm, Height=0.5mm, Length=1mm, Mount="Surface Mount", Packaging="Tape and Reel", Pricing 1="1=0,10000, 10=0,06000, 100=0,02650, 500=0,01894, 1000=0,01488, 2500=0,01352, 5000=0,01244 (USD)", Radiation Hardening=No, RoHS=Yes, Stock 1=4812, Supplier 1=Digi-Key, Termination=SMD/SMT, Thickness=0.022inch, Voltage Rating (DC)=6.3V, Width=0.5mm
C525 C526 C527 C528 C529 C530: library part Capacitor, Case Code (Imperial)=0402, Case Code (Metric)=1005, Dielectric=X7R, Dielectric Material=Ceramic, Manufacturer=KEMET, Manufacturer Part Number=C0402C103K8RACAUTO, Max Operating Temperature=125°C, Min Operating Temperature=-55°C, Package Quantity=1, Ratings=AEC-Q200, Supplier Part Number 1=399-6827-1-ND, Tolerance=10%, Voltage Rating=10V, Capacitance=10nF, Case/Package=0402, ComponentLink1Description=https://datasheet.ciiva.com/6255/datasheetpn-c0402c103k8racauto-6255096.pdf?src-supplier=Digi-Key, ComponentLink1URL=https://datasheet.ciiva.com/6255/datasheetpn-c0402c103k8racauto-6255096.pdf?src-supplier=Digi-Key, Length=0.039inch, Mount="Surface Mount", Packaging="Cut Tape", Pricing 1="1 = 0,10000, 10 = 0,06800, 100 = 0,03020, 500 = 0,02158, 1000 = 0,01695, 2500 = 0,01541, 5000 = 0,01418 (USD)", REACH SVHC="No SVHC", RoHS=Yes, Stock 1=59295, Supplier 1=Digi-Key, Thickness=0.022inch, Voltage Rating (DC)=10V, Width=0.02inch
C531 C532 C533 C534 C588 C589 C592: library part Capacitor, "Cap Ceramic 0.1uF 25V X7R 20% SMD 0402 125C Paper T/R", Case Code (Imperial)=0402, Case Code (Metric)=1005, Dielectric=X7R, Manufacturer=Murata, Manufacturer Part Number=GRM155R71E104ME14D, Max Operating Temperature=125°C, Min Operating Temperature=-55°C, Package Quantity=10000, Supplier Part Number 1=490-13341-1-ND, Tolerance=20%, Voltage Rating=25V, Capacitance=100nF, Case/Package=0402, Category="Ceramic Capacitors", ComponentLink1Description=http://www.mouser.com/ds/2/281/c02e-2905.pdf?src-supplier=Mouser, ComponentLink1URL=http://www.mouser.com/ds/2/281/c02e-2905.pdf?src-supplier=Mouser, ComponentLink2Description=http://components.arrow.com/part/dataview/0323_07278596?src-supplier=Arrow+Europe, ComponentLink2URL=http://components.arrow.com/part/dataview/0323_07278596?src-supplier=Arrow+Europe, ComponentLink3Description=http://search.murata.co.jp/Ceramy/image/img/A01X/partnumbering_e_01.pdf?src-supplier=Digi-Key, ComponentLink3URL=http://search.murata.co.jp/Ceramy/image/img/A01X/partnumbering_e_01.pdf?src-supplier=Digi-Key, ComponentLink4Description=http://search.murata.co.jp/Ceramy/image/img/A01X/G101/ENG/GRM155R71E104ME14-01.pdf?src-supplier=Digi-Key, ComponentLink4URL=http://search.murata.co.jp/Ceramy/image/img/A01X/G101/ENG/GRM155R71E104ME14-01.pdf?src-supplier=Digi-Key, Composition=Ceramic, Depth=0.5mm, Height=0.5mm, Lead Free="Lead Free", Length=1mm, Material=Ceramic, Mount="Surface Mount", Packaging="Tape and Reel", Pricing 1="1=0,10000, 10=0,03800, 100=0,01680, 500=0,01198, 1000=0,00941, 2500=0,00855, 5000=0,00787 (USD)", RoHS=Yes, Stock 1=57604, Supplier 1=Digi-Key, Termination=SMD/SMT, Thickness=0.022inch, Voltage Rating (DC)=25V, Weight=0.000212oz, Width=0.5mm
C537: "WR-COM USB 3.0 Horizontal Type A", Manufacturer="Würth Elektronik eiSos GmbH", partNo=692121130100, ComponentLink1 Description=Manufacturer, ComponentLink1URL=http://www.we-online.de, ComponentLink2 Description=Datasheet, ComponentLink2URL=http://katalog.we-online.de/em/datasheet/692121130100.pdf, Created by="Karrer Zheng", Created Date=10/10/2014, NoPins=9
C548: library part Capacitor, Case/Package=0402, Case Code (Metric)=1005, Dielectric=C0G, Manufacturer=Yageo, Manufacturer Part Number=CC0402JRNPO9BN110, Max Operating Temperature=125°C, Min Operating Temperature=-55°C, Package Quantity=1, Supplier Part Number 1=311-1015-1-ND, Tolerance=5%, Voltage Rating=50V, Capacitance=11pF, Case Code (Imperial)=0402, ComponentLink1Description=https://datasheet.ciiva.com/176/mlccorderingcode-176688.pdf?src-supplier=Digi-Key, ComponentLink1URL=https://datasheet.ciiva.com/176/mlccorderingcode-176688.pdf?src-supplier=Digi-Key, ComponentLink2Description=https://datasheet.ciiva.com/176/mlccorderingcode-176689.pdf?src-supplier=Digi-Key, ComponentLink2URL=https://datasheet.ciiva.com/176/mlccorderingcode-176689.pdf?src-supplier=Digi-Key, ComponentLink3Description=https://datasheet.ciiva.com/17434/upy-gp-np0-16v-to-50v-8-17434328.pdf?src-supplier=Avnet+Europe, ComponentLink3URL=https://datasheet.ciiva.com/17434/upy-gp-np0-16v-to-50v-8-17434328.pdf?src-supplier=Avnet+Europe, ComponentLink4Description=https://datasheet.ciiva.com/11587/upy-gp-np0-16v-to-50v-8-11587082.pdf?src-supplier=Avnet, ComponentLink4URL=https://datasheet.ciiva.com/11587/upy-gp-np0-16v-to-50v-8-11587082.pdf?src-supplier=Avnet, ComponentLink5Description=https://datasheet.ciiva.com/176/mlccorderingcode-176687.pdf?src-supplier=Digi-Key, ComponentLink5URL=https://datasheet.ciiva.com/176/mlccorderingcode-176687.pdf?src-supplier=Digi-Key, Composition=Ceramic, Depth=0.5mm, Lead Free="Lead Free", Length=1mm, Mount="Surface Mount", Packaging="Tape and Reel", Pricing 1="1 = 0,10000, 10 = 0,05100, 100 = 0,02260, 500 = 0,01614, 1000 = 0,01267, 2500 = 0,01152, 5000 = 0,01060 (USD)", Radiation Hardening=No, RoHS=Yes, Stock 1=23241, Supplier 1=Digi-Key, Termination=SMD/SMT, Thickness=0.022inch, Voltage Rating (DC)=50V, Width=0.02inch
C549: library part Capacitor, Case/Package=0402, Case Code (Metric)=1005, Dielectric=X7R, Dielectric Material=Ceramic, Insulation Resistance=100GR, Manufacturer=Yageo, Manufacturer Part Number=CC0402KRX7R9BB221, Max Operating Temperature=125°C, Min Operating Temperature=-55°C, Package Quantity=1, Supplier Part Number 1=311-1035-1-ND, Tolerance=10%, Voltage Rating=50V, Capacitance=220pF, Case Code (Imperial)=0402, ComponentLink1Description=https://datasheet.ciiva.com/5789/1489800-5789552.pdf?src-supplier=Farnell, ComponentLink1URL=https://datasheet.ciiva.com/5789/1489800-5789552.pdf?src-supplier=Farnell, ComponentLink2Description=https://datasheet.ciiva.com/26862/getdatasheetpartid-403476-26862648.pdf?src-supplier=Verical, ComponentLink2URL=https://datasheet.ciiva.com/26862/getdatasheetpartid-403476-26862648.pdf?src-supplier=Verical, ComponentLink3Description=https://datasheet.ciiva.com/143/mlccorderingcode-143968.pdf?src-supplier=Digi-Key, ComponentLink3URL=https://datasheet.ciiva.com/143/mlccorderingcode-143968.pdf?src-supplier=Digi-Key, ComponentLink4Description=https://datasheet.ciiva.com/143/mlccorderingcode-143969.pdf?src-supplier=Digi-Key, ComponentLink4URL=https://datasheet.ciiva.com/143/mlccorderingcode-143969.pdf?src-supplier=Digi-Key, ComponentLink5Description=https://datasheet.ciiva.com/143/mlccorderingcode-143970.pdf?src-supplier=Digi-Key, ComponentLink5URL=https://datasheet.ciiva.com/143/mlccorderingcode-143970.pdf?src-supplier=Digi-Key, ComponentLink6Description=https://datasheet.ciiva.com/11464/upy-gphc-x7r-6-3v-to-50v-8-11464901.pdf?src-supplier=Avnet, ComponentLink6URL=https://datasheet.ciiva.com/11464/upy-gphc-x7r-6-3v-to-50v-8-11464901.pdf?src-supplier=Avnet, ComponentLink7Description=https://datasheet.ciiva.com/8033/1489800-8033623.pdf?src-supplier=Element14, ComponentLink7URL=https://datasheet.ciiva.com/8033/1489800-8033623.pdf?src-supplier=Element14, ComponentLink8Description=https://datasheet.ciiva.com/8033/1489800-8033624.pdf?src-supplier=Element14, ComponentLink8URL=https://datasheet.ciiva.com/8033/1489800-8033624.pdf?src-supplier=Element14, ComponentLink9Description=https://datasheet.ciiva.com/13209/upy-gp-np0-16v-to-50v-8-13209048.pdf?src-supplier=Mouser, ComponentLink9URL=https://datasheet.ciiva.com/13209/upy-gp-np0-16v-to-50v-8-13209048.pdf?src-supplier=Mouser, ComponentLink10Description=https://datasheet.ciiva.com/28450/1489800-28450392.pdf?src-supplier=Element14, ComponentLink10URL=https://datasheet.ciiva.com/28450/1489800-28450392.pdf?src-supplier=Element14, ComponentLink11Description=https://datasheet.ciiva.com/17437/upy-gphc-x7r-6-3v-to-50v-8-17437183.pdf?src-supplier=Avnet+Europe, ComponentLink11URL=https://datasheet.ciiva.com/17437/upy-gphc-x7r-6-3v-to-50v-8-17437183.pdf?src-supplier=Avnet+Europe, Composition=Ceramic, Depth=0.5mm, Halogen Free="Halogen Free", Height=0.5mm, Lead Free="Lead Free", Length=1mm, Mount="Surface Mount", Number of Pins=2, Packaging="Tape and Reel", Pricing 1="1 = 0,10000, 10 = 0,02600, 100 = 0,01180, 500 = 0,00844, 1000 = 0,00662, 2500 = 0,00602, 5000 = 0,00554 (USD)", Radiation Hardening=No, REACH SVHC="No SVHC", RoHS=Yes, Stock 1=92511, Supplier 1=Digi-Key, Termination=SMD/SMT, Thickness=0.022inch, Voltage Rating (DC)=50V, Weight=2.3E-05oz, Width=0.02inch
C551 C553 C555: library part Capacitor, "CAP CER 10UF 6.3V X5R 0402", Case/Package=0402, Case Code (Metric)=1005, Manufacturer=Murata, Manufacturer Part Number=GRJ155R60J106ME11D, Max Operating Temperature=85°C, Min Operating Temperature=-55°C, Supplier Part Number 1=490-13211-1-ND, Tolerance=20%, Voltage Rating=6.3V, Capacitance=10uF, Case Code (Imperial)=0402, Category="Ceramic Capacitors", ComponentLink1Description=http://psearch.en.murata.com/capacitor/product/GRJ155R60J106ME11%23.pdf?src-supplier=Digi-Key, ComponentLink1URL=http://psearch.en.murata.com/capacitor/product/GRJ155R60J106ME11%23.pdf?src-supplier=Digi-Key, Features="Soft Termination", Length=0.039inch, Mount="Surface Mount", Packaging="Cut Tape", Pricing 1="1=0,22000, 10=0,15100, 100=0,07660, 500=0,05242, 1000=0,04637, 2500=0,04435, 5000=0,04032 (USD)", RoHS=Yes, Stock 1=222391, Supplier 1=Digi-Key, Thickness=0.028inch, Width=0.02inch
C558: "WR-COM_USB_Micro Type B_Vertical_THT", Manufacturer="Würth Elektronik eiSos GmbH", partNo=614105150721, ComponentLink1 Description=Manufacturer, ComponentLink1URL=http://www.we-online.de, ComponentLink2 Description=Datasheet, ComponentLink2URL=http://katalog.we-online.de/em/datasheet/614105150721.pdf, Created by="Karrer Zheng", Created Date=10/25/2014, NoPins=5
C571 C719: library part Capacitor, "CAP CER 1000PF 25V X5R 0201", Case/Package=0201, Dielectric=X5R, Manufacturer=Murata, Manufacturer Part Number=GRM033R61E102KA01D, Max Operating Temperature=85°C, Min Operating Temperature=-55°C, Supplier Part Number 1=490-14452-1-ND, Tolerance=10%, Voltage Rating (DC)=25V, Capacitance=1nF, Category="Ceramic Capacitors", ComponentLink1Description=http://components.arrow.com/part/dataview/0323_06094941?src-supplier=Arrow+Europe, ComponentLink1URL=http://components.arrow.com/part/dataview/0323_06094941?src-supplier=Arrow+Europe, ComponentLink2Description=https://search.murata.co.jp/Ceramy/image/img/A01X/G101/ENG/GRM033R61E102KA01-01.pdf?src-supplier=Digi-Key, ComponentLink2URL=https://search.murata.co.jp/Ceramy/image/img/A01X/G101/ENG/GRM033R61E102KA01-01.pdf?src-supplier=Digi-Key, ComponentLink3Description=http://search.murata.co.jp/Ceramy/image/img/A01X/G101/ENG/GRM033R61E102KA01-01.pdf?src-supplier=Digi-Key, ComponentLink3URL=http://search.murata.co.jp/Ceramy/image/img/A01X/G101/ENG/GRM033R61E102KA01-01.pdf?src-supplier=Digi-Key, Depth=0.3mm, Length=0.6mm, Packaging="Tape and Reel", Pricing 1="1=0,10000, 10=0,01800, 100=0,00790, 500=0,00564, 1000=0,00443, 2500=0,00402, 5000=0,00370 (USD)", RoHS=Yes, Stock 1=80983, Supplier 1=Digi-Key, Thickness=300um, Width=300um
C595 C596 C695 C696 C697 C698 C699: library part Capacitor, Dielectric=X5R, Manufacturer=Murata, Manufacturer Part Number=GRM21BR61H106KE43L, Supplier Part Number 1=490-18663-1-ND, Tolerance=10%, Voltage Rating (DC)=50V, Capacitance=10uF, Category="Ceramic Capacitors", Length=2mm, Pricing 1="1=0,49000, 10=0,33800, 100=0,20270, 500=0,15198, 1000=0,12835 (USD)", RoHS=No, Stock 1=3437, Supplier 1=Digi-Key, Thickness=1.25mm, Width=1.25mm
C603 C612: library part Capacitor, Case Code (Imperial)=0201, Case Code (Metric)=0603, Dielectric=C0G, Manufacturer=Murata, Manufacturer Part Number=GRM0335C1H430GA01D, Max Operating Temperature=125°C, Min Operating Temperature=-55°C, Package Quantity=15000, Supplier Part Number 1=490-14799-1-ND, Tolerance=2%, Voltage Rating=50V, Capacitance=43pF, Case/Package=0201, ComponentLink1Description=http://components.arrow.com/part/dataview/0323_07279725?src-supplier=Arrow+Europe, ComponentLink1URL=http://components.arrow.com/part/dataview/0323_07279725?src-supplier=Arrow+Europe, ComponentLink2Description=http://www.mouser.com/ds/2/281/c02e-2905.pdf?src-supplier=Mouser, ComponentLink2URL=http://www.mouser.com/ds/2/281/c02e-2905.pdf?src-supplier=Mouser, ComponentLink3Description=http://components.arrow.com/part/dataview/55790600S306921N2606?src-supplier=Arrow, ComponentLink3URL=http://components.arrow.com/part/dataview/55790600S306921N2606?src-supplier=Arrow, ComponentLink4Description=https://search.murata.co.jp/Ceramy/image/img/A01X/G101/ENG/GRM0335C1H430GA01-01.pdf?src-supplier=Digi-Key, ComponentLink4URL=https://search.murata.co.jp/Ceramy/image/img/A01X/G101/ENG/GRM0335C1H430GA01-01.pdf?src-supplier=Digi-Key, ComponentLink5Description=http://search.murata.co.jp/Ceramy/image/img/A01X/partnumbering_e_01.pdf?src-supplier=Digi-Key, ComponentLink5URL=http://search.murata.co.jp/Ceramy/image/img/A01X/partnumbering_e_01.pdf?src-supplier=Digi-Key, ComponentLink6Description=http://psearch.en.murata.com/capacitor/product/GRM0335C1H430GA01%23.pdf?src-supplier=Avnet, ComponentLink6URL=http://psearch.en.murata.com/capacitor/product/GRM0335C1H430GA01%23.pdf?src-supplier=Avnet, Depth=0.3mm, Lead Free="Lead Free", Length=0.024inch, Mount="Surface Mount", Packaging="Tape and Reel", Pricing 1="1 = 0,10000, 10 = 0,01800, 100 = 0,00810, 500 = 0,00578, 1000 = 0,00454, 2500 = 0,00412, 5000 = 0,00380 (USD)", RoHS=Yes, Stock 1=52010, Supplier 1=Digi-Key, Termination=SMD/SMT, Thickness=0.012inch, Voltage Rating (DC)=50V, Width=0.012inch
C604: library part Capacitor, "SMT Capacitor", Part Number=CL05A105MQ5NNNC, Supplier Part Number 1=1276-1235-6-ND, Supplier 1=Digi-Key
C605 C616: library part Capacitor, Case Code (Imperial)=0201, Case Code (Metric)=0603, Dielectric=C0G, Manufacturer=Murata, Manufacturer Part Number=GRM0335C1E101JA01D, Max Operating Temperature=125°C, Min Operating Temperature=-55°C, Package Quantity=15000, Supplier Part Number 1=490-3160-1-ND, Tolerance=5%, Voltage=25V, Capacitance=100pF, Case/Package=0201, ComponentLink1Description=https://datasheet.ciiva.com/16497/grm0335c1e101ja01-01-16497112.pdf?src-supplier=Future+Electronics, ComponentLink1URL=https://datasheet.ciiva.com/16497/grm0335c1e101ja01-01-16497112.pdf?src-supplier=Future+Electronics, ComponentLink2Description=https://datasheet.ciiva.com/18697/product-18697797.pdf?src-supplier=Digi-Key, ComponentLink2URL=https://datasheet.ciiva.com/18697/product-18697797.pdf?src-supplier=Digi-Key, Depth=0.3mm, Height=0.3mm, Lead Free="Lead Free", Length=0.6mm, Mount="Surface Mount", Packaging="Tape and Reel", Pricing 1="1 = 0,10000, 10 = 0,01300, 100 = 0,00560, 500 = 0,00400, 1000 = 0,00315, 2500 = 0,00286, 5000 = 0,00263 (USD)", Radiation Hardening=No, REACH SVHC="No SVHC", RoHS=Yes, Stock 1=1884783, Supplier 1=Digi-Key, Termination=SMD/SMT, Thickness=0.013inch, Voltage Rating=25V, Voltage Rating (DC)=25V, Width=0.012inch